# Altium PCB PCB.PcbDoc (part 2 of 2)
Units mil, origin at the board's own origin, x right, y up, seen from the top; angles counter-clockwise.
Board outline 3937.01 x 3937.01 mil, 4 copper layers (Top Layer, GND, POWER, Bottom Layer), stack 61.066 mil thick; 102 components, 56 nets, 281 pads, 1348 vias.
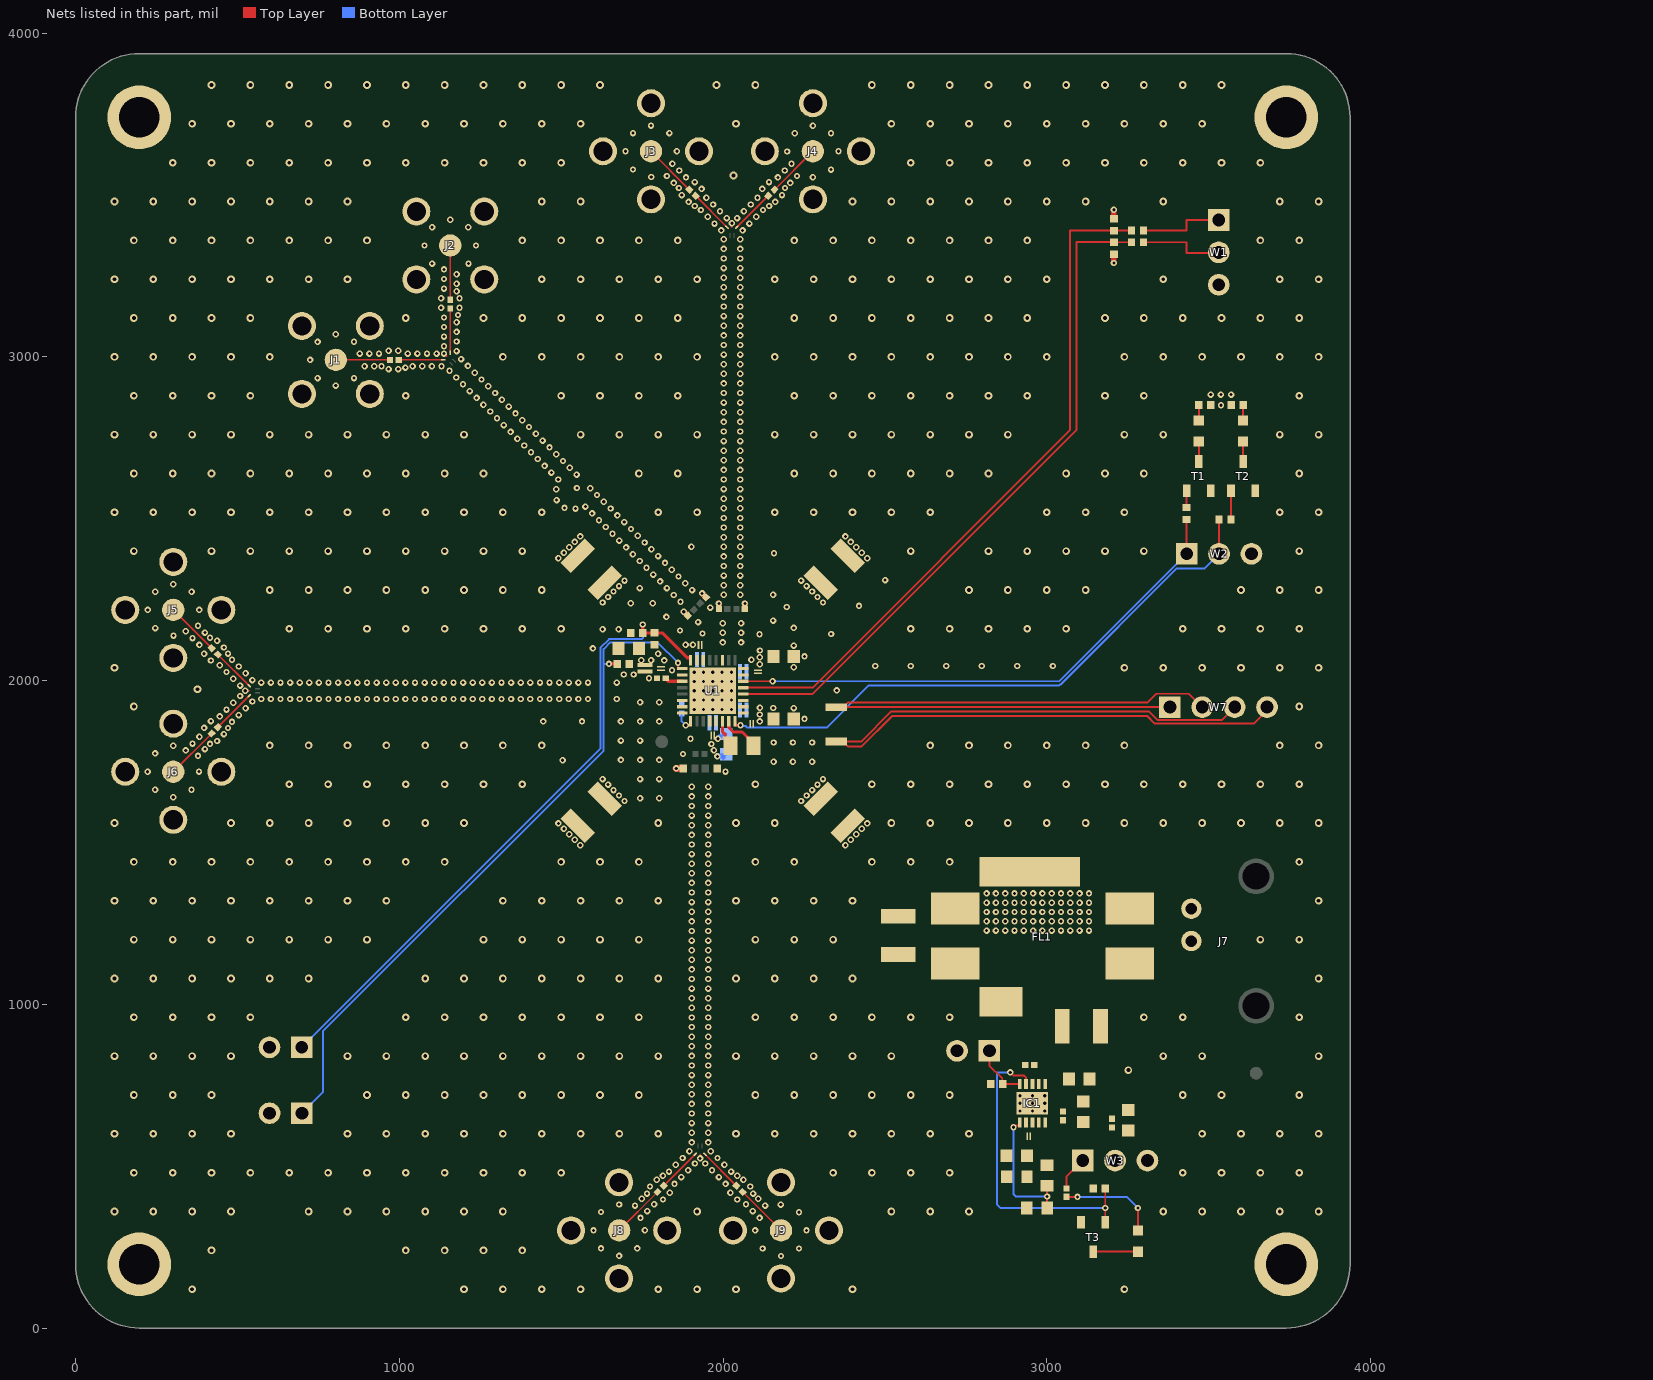
[diagram p4: the nets of this part, all layers, seen from the top]

## Via types
v1: diameter 19.68, hole 9.84, Top Layer to Bottom Layer, tented both sides, 742 vias
v2: diameter 23.62, hole 11.81, Top Layer to Bottom Layer, tented both sides, 597 vias
v3: diameter 19.68, hole 9.84, Top Layer to Bottom Layer, 9 vias

## Nets (pads, with @x,y where several pads share a name; then routed paths per layer and width w, separated by ;. In a path a pad name is that pad's centre, name@x,y a point inside that pad or via, vN(x,y) a via of type N, cw(c..) or ccw(c..) an arc to the next point about the centre after c; other vN are vias at no path point) (continued)
GND: C5.1 C6.1 C7.1 C8.1 C9.1 C10.1 C11.1 C12.1 C13.1 C14.1 C15.1 C19.1 C20.1 C21.1 C22.1 C23.1 C24.1 C25.1 C26.1 C27.1 C28.1 C29.1 C30.1 C31.1 C32.1 C33.1 C34.1 C35.1 C36.1 FL1.4 FL1.4_1 FL1.4_2 IC1.8 IC1.11 J1.2 J1.2_1 J1.2_2 J1.2_3 J2.2 J2.2_1 J2.2_2 J2.2_3 J3.2 J3.2_1 J3.2_2 J3.2_3 J4.2 J4.2_1 J4.2_2 J4.2_3 J5.2 J5.2_1 J5.2_2 J5.2_3 J6.2 J6.2_1 J6.2_2 J6.2_3 J8.2 J8.2_1 J8.2_2 J8.2_3 J9.2 J9.2_1 J9.2_2 J9.2_3 pad.Frame_Holes R6.1 R16.1 R17.1 R21.1 R22.1 R25.1 T1.2 T2.2 T3.2 U1.6 U1.7 U1.8 U1.13 U1.17 U1.19 U1.23 U1.27 U1.30 U1.33 W1.3 W2.3 W3.3 W4.2 W5.2 W6.2 | length 51.8
  Top Layer w5: v1@530.96,1968.5 536.09,1968.5 ; v1@1142.77,3005.49 1146.39,3001.87 ; v1@1929.13,530.96 1929.13,536.09 ; 2027.56,3400.92 v1@2027.56,3406.05
  Bottom Layer w6: C20.1@1991.46,1827.77 cw(c2010.37,1808.86) C20.1@2010.37,1835.6
  Bottom Layer w15: v1(1984.17,1820.49) C20.1@1991.46,1827.77
  other v1: 1679.13,222.85 2179.13,222.59 1622.94,246.13 1735.33,246.13 2122.39,245.58 2234.78,245.58 1599.95,301.77 1758.61,302.32 2099.11,301.77 2258.06,301.77 1745.18,340.33 2113.09,340.33 2234.78,357.97 1622.94,358.52 1766.17,361.33 2092.1,361.33 1728.19,378.31 2130.08,378.31 2178.58,381.25 1679.13,381.8 1787.16,382.32 2071.11,382.32 1814.52,396.94 2043.75,396.94 1749.18,399.3 2109.09,399.3 1765.27,415.39 2093,415.39 1835.51,417.93 2022.76,417.93 1774.3,437.16 2083.97,437.16 1850.13,445.29 2008.14,445.29 1795.29,458.15 2062.98,458.15 1871.12,466.28 1987.15,466.28 1814.22,470.71 2044.05,470.71 1833.14,483.26 2025.12,483.26 1892.11,487.27 1966.16,487.27 1854.13,504.26 2004.13,504.26 1913.1,508.26 1945.16,508.26 1929.13,524.18 1875.13,525.25 1983.14,525.25 1896.12,546.24 1962.15,546.24 1903.68,573.61 1954.58,573.61 1903.68,603.29 1954.58,603.29 1903.68,632.98 1954.58,632.98 1903.68,662.66 1954.58,662.66 1903.68,692.35 1954.58,692.35 1903.68,722.03 1954.58,722.03 1903.68,751.72 1954.58,751.72 1903.68,781.4 1954.58,781.4 1903.68,811.09 1954.58,811.09 1903.68,840.77 1954.58,840.77 1903.68,870.46 1954.58,870.46 1903.68,900.14 1954.58,900.14 1903.68,929.83 1954.58,929.83 1903.68,959.51 1954.58,959.51 1903.68,989.2 1954.58,989.2 1903.68,1018.88 1954.58,1018.88 1903.68,1048.57 1954.58,1048.57 1903.68,1078.25 1954.58,1078.25 1903.68,1107.94 1954.58,1107.94 1903.68,1137.62 1954.58,1137.62 1903.68,1167.31 1954.58,1167.31 1903.68,1196.99 1954.58,1196.99 1903.68,1226.68 1954.58,1226.68 2814.21,1227.86 2842.95,1227.86 2871.7,1227.86 2900.45,1227.86 2929.2,1227.86 2957.95,1227.86 2986.69,1227.86 3015.44,1227.86 3044.19,1227.86 3072.94,1227.86 3101.69,1227.86 3130.43,1227.86 1903.68,1256.36 1954.58,1256.36 2814.21,1256.6 2842.95,1256.6 2871.7,1256.6 2900.45,1256.6 2929.2,1256.6 2957.95,1256.6 2986.69,1256.6 3015.44,1256.6 3044.19,1256.6 3072.94,1256.6 3101.69,1256.6 3130.43,1256.6 2814.21,1285.35 2842.95,1285.35 2871.7,1285.35 2900.45,1285.35 2929.2,1285.35 2957.95,1285.35 2986.69,1285.35 3015.44,1285.35 3044.19,1285.35 3072.94,1285.35 3101.69,1285.35 3130.43,1285.35 1903.68,1286.05 1954.58,1286.05 2814.21,1314.1 2842.95,1314.1 2871.7,1314.1 2900.45,1314.1 2929.2,1314.1 2957.95,1314.1 2986.69,1314.1 3015.44,1314.1 3044.19,1314.1 3072.94,1314.1 3101.69,1314.1 3130.43,1314.1 1903.68,1315.73 1954.58,1315.73 2814.21,1342.85 2842.95,1342.85 2871.7,1342.85 2900.45,1342.85 2929.2,1342.85 2957.95,1342.85 2986.69,1342.85 3015.44,1342.85 3044.19,1342.85 3072.94,1342.85 3101.69,1342.85 3130.43,1342.85 1903.68,1345.42 1954.58,1345.42 1903.68,1375.1 1954.58,1375.1 1903.68,1404.79 1954.58,1404.79 1903.68,1434.47 1954.58,1434.47 1903.68,1464.16 1954.58,1464.16 1559.09,1491.48 2377.92,1491.48 1903.68,1493.84 1954.58,1493.84 1542.19,1508.38 2394.82,1508.38 1903.68,1523.53 1954.58,1523.53 1525.28,1525.28 2411.72,1525.28 1508.38,1542.19 2428.63,1542.19 1903.68,1553.21 1954.58,1553.21 1491.48,1559.09 2445.53,1559.09 1903.68,1582.9 1954.58,1582.9 1903.68,1612.58 1954.58,1612.58 1743.88,1636.47 1803.25,1636.47 301.77,1639.58 1903.68,1642.27 1954.58,1642.27 245.58,1662.86 357.97,1662.86 1903.68,1671.95 1954.58,1671.95 1743.88,1695.84 1803.25,1695.84 222.59,1718.5 381.25,1719.06 2007.84,1718.94 2156.43,1749.38 2215.8,1749.38 2275.17,1749.38 1504.51,1753.95 1684.51,1755.21 1743.88,1755.21 1803.25,1755.21 378.31,1767.56 1876.58,1773.39 245.58,1775.25 340.33,1784.55 399.3,1788.55 301.77,1798.53 415.39,1804.64 361.33,1805.54 2156.43,1808.75 2215.8,1808.75 2275.17,1808.75 437.16,1813.67 1684.51,1814.58 1743.88,1814.58 1899.61,1820.49 382.32,1826.53 458.15,1834.66 396.94,1853.89 470.71,1853.59 483.26,1872.51 1444.51,1873.95 1564.51,1873.95 1684.51,1873.95 1743.88,1873.95 1803.25,1873.95 417.93,1874.88 2251.85,1881.74 445.29,1889.5 504.26,1893.51 466.28,1910.49 1911.01,1911.01 1939.76,1911.01 1968.5,1911.01 1997.25,1911.01 2026,1911.01 525.25,1914.5 2218.42,1915.17 487.27,1931.48 1743.88,1933.32 1803.25,1933.32 546.24,1935.49 1911.01,1939.76 1939.76,1939.76 1968.5,1939.76 1997.25,1939.76 2026,1939.76 573.61,1943.05 603.29,1943.05 632.98,1943.05 662.66,1943.05 692.35,1943.05 722.03,1943.05 751.72,1943.05 781.4,1943.05 811.09,1943.05 840.77,1943.05 870.46,1943.05 900.14,1943.05 929.83,1943.05 959.51,1943.05 989.2,1943.05 1018.88,1943.05 1048.57,1943.05 1078.25,1943.05 1107.94,1943.05 1137.62,1943.05 1167.31,1943.05 1196.99,1943.05 1226.68,1943.05 1256.36,1943.05 1286.05,1943.05 1315.73,1943.05 1345.42,1943.05 1375.1,1943.05 1404.79,1943.05 1434.47,1943.05 1464.16,1943.05 1493.84,1943.05 1523.53,1943.05 1553.21,1943.05 1582.9,1943.05 1671.95,1943.05 508.26,1952.47 524.18,1968.5 1911.01,1968.5 1939.76,1968.5 1968.5,1968.5 1997.25,1968.5 2026,1968.5 2351.17,1969.93 508.26,1984.53 573.61,1993.95 603.29,1993.95 632.98,1993.95 662.66,1993.95 692.35,1993.95 722.03,1993.95 751.72,1993.95 781.4,1993.95 811.09,1993.95 840.77,1993.95 870.46,1993.95 900.14,1993.95 929.83,1993.95 959.51,1993.95 989.2,1993.95 1018.88,1993.95 1048.57,1993.95 1078.25,1993.95 1107.94,1993.95 1137.62,1993.95 1167.31,1993.95 1196.99,1993.95 1226.68,1993.95 1256.36,1993.95 1286.05,1993.95 1315.73,1993.95 1345.42,1993.95 1375.1,1993.95 1404.79,1993.95 1434.47,1993.95 1464.16,1993.95 1493.84,1993.95 1523.53,1993.95 1553.21,1993.95 1582.9,1993.95 1671.95,1993.95 1911.01,1997.25 1939.76,1997.25 1968.5,1997.25 1997.25,1997.25 2026,1997.25 546.24,2001.52 487.27,2005.53 1771.31,2007.16 1693.55,2018.84 1723.93,2018.84 525.25,2022.51 1911.01,2026 1939.76,2026 1968.5,2026 1997.25,2026 2026,2026 466.28,2026.52 2218.42,2041.39 504.26,2043.5 2470.11,2045 2579.87,2045 2689.64,2045 2799.4,2045 2909.16,2045 3018.92,2045 445.29,2047.51 417.93,2062.13 483.26,2064.49 2251.85,2074.82 396.94,2083.12 470.71,2083.42 1597.99,2099.58 458.15,2102.35 2218.42,2108.25 382.32,2110.48 1999.1,2118.14 2056.02,2118.14 437.16,2123.34 361.33,2131.47 415.39,2132.37 302.32,2139.03 2112.8,2143.5 2333.79,2144.14 1936.5,2145.7 399.3,2148.46 1999.1,2147.82 2056.02,2147.82 340.33,2152.46 1867.12,2154.97 1628.07,2158.93 1677.35,2158.93 246.13,2162.31 2218.42,2163.02 378.31,2169.45 1999.1,2177.51 2056.02,2177.51 1922.97,2180.89 2154.78,2185.48 1825.14,2196.95 222.85,2218.5 381.8,2218.5 1960.64,2225.43 2196.76,2227.47 2419.95,2230.89 1715.18,2238.93 1783.16,2238.93 1868.6,2243.67 1847.61,2264.66 2002.11,2265.05 2053.01,2265.05 2154.78,2265.05 246.13,2274.7 358.52,2274.7 1904.59,2279.66 1742.66,2285.65 1826.62,2285.65 2002.11,2294.74 2053.01,2294.74 301.77,2297.69 1883.6,2300.65 1805.63,2306.64 2500.8,2310.55 1862.61,2321.64 2002.11,2324.42 2053.01,2324.42 1784.64,2327.63 1841.62,2342.63 1763.65,2348.62 2002.11,2354.11 2053.01,2354.11 1820.63,2363.62 1742.66,2369.61 1491.48,2377.92 2445.53,2377.92 2002.11,2383.79 2053.01,2383.79 1799.64,2384.61 1721.67,2390.6 2157.35,2393.76 1508.38,2394.82 2428.63,2394.82 1778.65,2405.6 1525.28,2411.72 1700.68,2411.59 2411.72,2411.72 1902.42,2413.48 2002.11,2413.48 2053.01,2413.48 1757.66,2426.59 1542.19,2428.63 2394.82,2428.63 1679.69,2432.58 2002.11,2443.16 2053.01,2443.16 1559.09,2445.53 2377.92,2445.53 1736.67,2447.58 1658.7,2453.57 1715.68,2468.57 2002.11,2472.85 2053.01,2472.85 1637.71,2474.56 1694.69,2489.56 1616.72,2495.55 2002.11,2502.53 2053.01,2502.53 1673.7,2510.55 1595.73,2516.54 1544.25,2531.32 1652.71,2531.54 2002.11,2532.22 2053.01,2532.22 1510.33,2533.5 1574.74,2537.53 1631.72,2552.53 1486.07,2557.76 2002.11,2561.9 2053.01,2561.9 1610.73,2573.52 1484.56,2591.01 2002.11,2591.59 2053.01,2591.59 1548.69,2595.21 1589.74,2594.51 1490.77,2621.49 2002.11,2621.27 2053.01,2621.27 1547.76,2636.5 1469.78,2642.48 2002.11,2650.96 2053.01,2650.96 1526.77,2657.49 1448.79,2663.47 1505.78,2678.48 2002.11,2680.64 2053.01,2680.64 1427.8,2684.47 1484.78,2699.47 1406.81,2705.46 2002.11,2710.33 2053.01,2710.33 1463.79,2720.46 1385.82,2726.45 2002.11,2740.01 2053.01,2740.01 1442.8,2741.45 1364.83,2747.44 1421.81,2762.44 1343.84,2768.43 2002.11,2769.7 2053.01,2769.7 1400.82,2783.43 1322.85,2789.42 2002.11,2799.38 2053.01,2799.38 1379.83,2804.42 1301.86,2810.41 1358.84,2825.41 2002.11,2829.07 2053.01,2829.07 1280.87,2831.4 1337.85,2846.4 1259.88,2852.39 2002.11,2858.75 2053.01,2858.75 1316.86,2867.39 1238.89,2873.38 1295.87,2888.38 2002.11,2888.44 2053.01,2888.44 1217.9,2894.37 1274.88,2909.37 803.93,2911.3 1196.91,2915.36 2002.11,2918.12 2053.01,2918.12 1253.89,2930.36 747.73,2934.58 860.12,2934.58 1175.92,2936.35 2002.11,2947.81 2053.01,2947.81 1232.9,2951.35 1154.93,2957.34 966.95,2962.33 996.64,2962.33 1018.9,2966.84 892.74,2971.34 922.42,2971.34 945.17,2971.34 1041.17,2971.34 1070.85,2971.34 1100.54,2971.34 1130.22,2971.34 1211.91,2972.34 2002.11,2977.49 2053.01,2977.49 724.45,2990.78 1190.92,2993.33 2002.11,3007.18 2053.01,3007.18 877.9,3010.21 907.58,3010.21 937.27,3010.21 1026.32,3010.21 1056.01,3010.21 1085.69,3010.21 1115.38,3010.21 1137.97,3010.29 1176.91,3018.04 966.95,3019.22 996.64,3019.22 1138.05,3032.88 2002.11,3036.86 2053.01,3036.86 747.55,3046.38 860.12,3046.97 1176.91,3047.72 1138.05,3062.57 2002.11,3066.55 2053.01,3066.55 803.93,3070.25 1176.91,3077.41 1138.05,3092.25 2002.11,3096.23 2053.01,3096.23 1176.91,3107.09 1138.05,3121.94 2002.11,3125.92 2053.01,3125.92 1181.42,3129.36 1129.04,3151.62 1185.92,3151.62 2002.11,3155.6 2053.01,3155.6 1129.04,3181.31 1185.92,3181.31 2002.11,3185.29 2053.01,3185.29 1176.91,3203.09 1138.05,3210.99 2002.11,3214.97 2053.01,3214.97 1176.91,3225.83 1138.05,3240.68 2002.11,3244.66 2053.01,3244.66 1176.91,3255.52 1138.05,3270.36 2002.11,3274.34 2053.01,3274.34 1101.29,3288.13 1213.68,3288.13 2002.11,3304.03 2053.01,3304.03 2002.11,3333.71 2053.01,3333.71 1078.01,3344.33 1236.96,3344.33 2002.11,3363.4 2053.01,3363.4 1994.54,3390.77 2060.58,3390.77 1101.29,3400.53 1213.08,3400.71 1973.55,3411.76 2081.57,3411.76 2027.56,3412.83 1157.48,3423.8 2011.53,3428.75 2043.59,3428.75 1952.56,3432.75 2102.56,3432.75 1990.54,3449.74 2064.58,3449.74 1931.57,3453.74 2123.55,3453.74 1912.64,3466.3 2142.48,3466.3 1969.55,3470.73 2085.57,3470.73 1893.71,3478.86 2161.41,3478.86 1948.56,3491.72 2106.56,3491.72 1872.72,3499.85 2182.4,3499.85 1933.94,3519.08 2121.18,3519.08 1863.69,3521.62 2191.43,3521.62 1847.61,3537.7 2207.51,3537.7 1912.95,3540.07 2142.17,3540.07 1885.59,3554.69 2169.53,3554.69 2277.56,3555.21 1778.11,3555.76 1826.62,3558.7 2228.5,3558.7 1864.59,3575.68 2190.52,3575.68 2333.76,3578.49 1721.91,3579.04 1843.6,3596.67 2211.51,3596.67 1698.64,3635.24 1857.58,3635.24 2198.09,3634.68 2356.74,3635.24 1721.91,3691.43 1834.31,3691.43 2221.36,3690.88 2333.76,3690.88 1777.56,3714.42 2277.56,3714.16
  other v2: 360,120 1200,120 1320,120 1440,120 1560,120 1800,120 1920,120 2040,120 2400,120 3240,120 420,240 1020,240 1140,240 1260,240 1380,240 120,360 240,360 360,360 480,360 720,360 840,360 960,360 1080,360 1200,360 1320,360 1920,360 2520,360 2640,360 2760,360 3360,360 3480,360 3600,360 3720,360 3840,360 180,480 300,480 420,480 540,480 660,480 780,480 900,480 1020,480 1140,480 1260,480 1380,480 1500,480 2340,480 2460,480 2580,480 2700,480 3420,480 3540,480 3660,480 3780,480 120,600 240,600 360,600 480,600 840,600 960,600 1080,600 1200,600 1320,600 1440,600 1560,600 1680,600 1800,600 2040,600 2160,600 2280,600 2400,600 2520,600 2640,600 2760,600 3480,600 3600,600 3720,600 3840,600 180,720 300,720 420,720 900,720 1020,720 1140,720 1260,720 1380,720 1500,720 1620,720 1740,720 2100,720 2220,720 2340,720 2460,720 2580,720 2700,720 3420,720 3540,720 3780,720 3252.31,796.93 120,840 240,840 360,840 480,840 840,840 960,840 1080,840 1200,840 1320,840 1440,840 1560,840 1680,840 1800,840 2040,840 2160,840 2280,840 2400,840 2520,840 3360,840 3480,840 3840,840 180,960 300,960 420,960 540,960 1020,960 1140,960 1260,960 1380,960 1500,960 1620,960 1740,960 2100,960 2220,960 2340,960 2460,960 2580,960 2700,960 3300,960 3420,960 3780,960 120,1080 240,1080 360,1080 480,1080 600,1080 720,1080 1080,1080 1200,1080 1320,1080 1440,1080 1560,1080 1680,1080 1800,1080 2040,1080 2160,1080 2280,1080 2400,1080 3840,1080 180,1200 300,1200 420,1200 540,1200 660,1200 780,1200 900,1200 1260,1200 1380,1200 1500,1200 1620,1200 1740,1200 2100,1200 2220,1200 2340,1200 3660,1200 3780,1200 120,1320 240,1320 360,1320 480,1320 600,1320 720,1320 840,1320 960,1320 1320,1320 1440,1320 1560,1320 1680,1320 1800,1320 2040,1320 2160,1320 2280,1320 2400,1320 3840,1320 180,1440 300,1440 420,1440 540,1440 660,1440 780,1440 900,1440 1020,1440 1140,1440 1500,1440 1620,1440 1740,1440 2100,1440 2220,1440 2460,1440 2580,1440 2700,1440 3780,1440 120,1560 480,1560 600,1560 720,1560 840,1560 960,1560 1080,1560 1200,1560 1800,1560 2040,1560 2160,1560 2520,1560 2640,1560 2760,1560 2880,1560 3000,1560 3120,1560 3240,1560 3360,1560 3480,1560 3600,1560 3720,1560 3840,1560 660,1680 780,1680 900,1680 1020,1680 1140,1680 1260,1680 1380,1680 2100,1680 2460,1680 2580,1680 2700,1680 2820,1680 2940,1680 3060,1680 3180,1680 3300,1680 3420,1680 3540,1680 3660,1680 3780,1680 600,1800 720,1800 840,1800 960,1800 1080,1800 1200,1800 1320,1800 1440,1800 2640,1800 2760,1800 2880,1800 3000,1800 3120,1800 3240,1800 3720,1800 3840,1800 180,1920 3780,1920 376.42,1973.49 120,2040 3240,2040 3360,2040 3480,2040 3600,2040 3720,2040 3840,2040 660,2160 780,2160 900,2160 1020,2160 1140,2160 1260,2160 1380,2160 1500,2160 2580,2160 2700,2160 2820,2160 2940,2160 3060,2160 3420,2160 3540,2160 3660,2160 3780,2160 600,2280 720,2280 840,2280 960,2280 1080,2280 1200,2280 1320,2280 1440,2280 2760,2280 2880,2280 3000,2280 3120,2280 3600,2280 3720,2280 3840,2280 180,2400 420,2400 540,2400 660,2400 780,2400 900,2400 1020,2400 1140,2400 1260,2400 1380,2400 2580,2400 2820,2400 2940,2400 3060,2400 3180,2400 3300,2400 3780,2400 120,2520 240,2520 360,2520 480,2520 600,2520 720,2520 840,2520 960,2520 1080,2520 1200,2520 1320,2520 1440,2520 1800,2520 1920,2520 2160,2520 2280,2520 2400,2520 2520,2520 2640,2520 3000,2520 3120,2520 3240,2520 3720,2520 3840,2520 180,2640 300,2640 420,2640 540,2640 660,2640 780,2640 900,2640 1020,2640 1140,2640 1260,2640 1740,2640 1860,2640 2220,2640 2340,2640 2460,2640 2580,2640 2700,2640 2820,2640 3060,2640 3180,2640 3300,2640 3780,2640 120,2760 240,2760 360,2760 480,2760 600,2760 720,2760 840,2760 960,2760 1080,2760 1200,2760 1560,2760 1680,2760 1800,2760 1920,2760 2160,2760 2280,2760 2400,2760 2520,2760 2640,2760 2760,2760 2880,2760 3240,2760 3360,2760 3720,2760 3840,2760 180,2880 300,2880 420,2880 540,2880 1020,2880 1500,2880 1620,2880 1740,2880 1860,2880 2220,2880 2340,2880 2460,2880 2580,2880 2700,2880 2820,2880 2940,2880 3180,2880 3300,2880 3780,2880 120,3000 240,3000 360,3000 480,3000 600,3000 1320,3000 1440,3000 1560,3000 1680,3000 1800,3000 1920,3000 2160,3000 2280,3000 2400,3000 2520,3000 2640,3000 2760,3000 2880,3000 3000,3000 3240,3000 3360,3000 3480,3000 3600,3000 3720,3000 3840,3000 180,3120 300,3120 420,3120 540,3120 1020,3120 1260,3120 1380,3120 1500,3120 1620,3120 1740,3120 1860,3120 2220,3120 2340,3120 2460,3120 2580,3120 2700,3120 2820,3120 2940,3120 3180,3120 3300,3120 3420,3120 3540,3120 3660,3120 3780,3120 120,3240 240,3240 360,3240 480,3240 600,3240 720,3240 840,3240 1440,3240 1560,3240 1680,3240 1800,3240 1920,3240 2160,3240 2280,3240 2400,3240 2520,3240 2640,3240 2760,3240 2880,3240 3000,3240 3360,3240 3720,3240 3840,3240 180,3360 300,3360 420,3360 540,3360 660,3360 780,3360 900,3360 1380,3360 1500,3360 1620,3360 1740,3360 1860,3360 2220,3360 2340,3360 2460,3360 2580,3360 2700,3360 2820,3360 2940,3360 3660,3360 3780,3360 120,3480 240,3480 360,3480 480,3480 600,3480 720,3480 840,3480 1440,3480 1560,3480 2400,3480 2520,3480 2640,3480 2760,3480 2880,3480 3000,3480 3120,3480 3360,3480 3720,3480 3840,3480 2032.54,3560.59 300,3600 420,3600 540,3600 660,3600 780,3600 900,3600 1020,3600 1140,3600 1260,3600 1380,3600 1500,3600 2580,3600 2700,3600 2820,3600 2940,3600 3060,3600 3180,3600 3300,3600 3420,3600 3540,3600 3660,3600 360,3720 480,3720 600,3720 720,3720 840,3720 960,3720 1080,3720 1200,3720 1320,3720 1440,3720 1560,3720 2040,3720 2520,3720 2640,3720 2760,3720 2880,3720 3000,3720 3120,3720 3240,3720 3360,3720 3480,3720 420,3840 540,3840 660,3840 780,3840 900,3840 1020,3840 1140,3840 1260,3840 1380,3840 1500,3840 1620,3840 1980,3840 2100,3840 2460,3840 2580,3840 2700,3840 2820,3840 2940,3840 3060,3840 3180,3840 3300,3840 3420,3840 3540,3840
  other v3: 2917.42,670.89 2955.79,670.89 2994.16,670.89 2917.43,694.39 2955.8,694.39 2994.17,694.39 2917.42,717.89 2955.79,717.89 2994.16,717.89
LDO_out: C31.2 C32.2 IC1.9 IC1.10 R19.2 R20.2 R23.2 SW1.1 W3.1 | length 97
  Top Layer w6: 3060.75,441.33 3060.75,467.1 W3.1@3111.12,517.47
LOL: R15.1 U1.16 W2.2 | length 1837.2
  Top Layer w6: W2.2@3532.33,2391.73 R15.1@3532.33,2497.7
  Top Layer w7.77: U1.16@2037.4,1874 2037.4,1863.54 2038.52,1862.42 v1(2054.11,1862.42)
  Bottom Layer w6: v1(2054.11,1862.42) 2056.73,1859.8 2069.48,1859.8 2074.22,1855.06 2320.35,1855.06 2450.29,1985 3038.62,1985 3041.66,1988.03 3042.77,1988.03 3401.63,2346.89 3487.48,2346.89 W2.2@3532.33,2391.73
LOS: R14.1 U1.22 W2.1 | length 1638.4
  Top Layer w6: U1.22@2063,1998.03 v1(2153.15,1998.03) ; W2.1@3432.33,2391.73 R14.1@3432.33,2497.7
  Bottom Layer w6: v1(2153.15,1998.03) 3038.62,1998.03 W2.1@3432.33,2391.73
NetC1_1: C1.1 TA1.S | length 137
  Top Layer w5.18: C1.1@998.86,2990.78 TA1.S@1135.88,2990.78
NetC1_2: C1.2 J1.1 | length 167.4
  Top Layer w5.18: J1.1@803.93,2990.78 C1.2@971.3,2990.78
NetC2_1: C2.1 TA2.S | length 137
  Top Layer w5.18: TA2.S@1157.48,3012.37 C2.1@1157.48,3149.4
NetC2_2: C2.2 J2.1 | length 167.4
  Top Layer w5.18: C2.2@1157.48,3176.96 J2.1@1157.48,3344.33
NetC3_1: C3.1 TA3.S | length 137
  Top Layer w5.18: C3.1@1915.39,3497.4 TA3.S@2012.29,3400.51
NetC3_2: C3.2 J3.1 | length 167.4
  Top Layer w5.18: J3.1@1777.56,3635.24 C3.2@1895.91,3516.89
NetC4_1: C4.1 TA4.S | length 137
  Top Layer w5.18: TA4.S@2042.83,3400.51 C4.1@2139.72,3497.4
NetC4_2: C4.2 J4.1 | length 167.4
  Top Layer w5.18: C4.2@2159.21,3516.89 J4.1@2277.56,3635.24
NetC15_2: C15.2 U1.3 | length 57.3
  Top Layer w10: C15.2@1820.52,2007.16 1821.5,2007.16 1830.63,1998.03 U1.3@1874,1998.03
NetC16_1: C16.1 J5.1 | length 167.4
  Top Layer w5.18: J5.1@301.77,2218.5 C16.1@420.12,2100.16
NetC16_2: C16.2 TA5.S | length 137
  Top Layer w5.18: C16.2@439.61,2080.67 TA5.S@536.5,1983.78
NetC17_1: C17.1 J6.1 | length 167.4
  Top Layer w5.18: J6.1@301.77,1718.5 C17.1@420.12,1836.85
NetC17_2: C17.2 TA6.S | length 137
  Top Layer w5.18: C17.2@439.61,1856.34 TA6.S@536.5,1953.23
NetC18_1: C18.1 U1.14 | length 85
  Top Layer w10: U1.14@1998.03,1874 1998.03,1842.71 2006.52,1834.22 2006.52,1816.02 C18.1@2023.18,1799.37
NetC18_2: C18.2 U1.15 | length 122.1
  Top Layer w10: U1.15@2017.72,1874 2017.72,1855.52 2031.93,1841.31 2058.99,1841.31 2094.04,1806.26 C18.2@2094.04,1799.37
NetC35_2: C35.2 C36.2 IC1.7 R17.2
NetC37_1: C37.1 J8.1 | length 167.4
  Top Layer w5.18: J8.1@1679.13,301.77 C37.1@1797.48,420.12
NetC37_2: C37.2 TA7.S | length 137
  Top Layer w5.18: C37.2@1816.97,439.61 TA7.S@1913.86,536.5
NetC38_1: C38.1 J9.1 | length 167.4
  Top Layer w5.18: C38.1@2060.79,420.12 J9.1@2179.13,301.77
NetC38_2: C38.2 TA8.S | length 137
  Top Layer w5.18: TA8.S@1944.41,536.5 C38.2@2041.3,439.61
NetFL1_1: FL1.1 J7.1
NetFL1_3: FL1.3 J7.2
NetIC1_5: IC1.5 R16.2 W4.1 | length 176.7
  Top Layer w6: W4.1@2822.9,856.5 2822.9,810.9 2862.66,771.13 2862.66,755.41 R16.2@2864.63,753.44 IC1.5@2916.43,753.44 2916.43,757.32 IC1.5@2915.98,757.77
NetIC2_1: IC2.1 W7.1 W7.2 | length 2173.6
  Top Layer w6: IC2.1@2350,1918.15 IC2.1@2371.65,1918.15 ; W7.1@3380.51,1918.15 IC2.1@2371.65,1918.15 ; W7.2@3480.51,1918.15 3439.19,1959.47 3338.36,1959.47 3311.68,1932.79 2386.29,1932.79 IC2.1@2371.65,1918.15
NetIC2_2: IC2.2 W7.3 W7.4 | length 2687.9
  Top Layer w6: IC2.2@2350,1811.85 IC2.2@2371.65,1811.85 ; W7.3@3580.51,1918.15 3540.04,1877.68 3342.32,1877.68 3315,1905 2519.87,1905 2426.72,1811.85 IC2.2@2371.65,1811.85 ; W7.4@3680.51,1918.15 3680.51,1907.79 3640.87,1868.15 3332.68,1868.15 3310.11,1890.71 2522.18,1890.71 2427.46,1796 2387.5,1796 IC2.2@2371.65,1811.85
NetLD1_1: LD1.1 T1.3 | length 61.6
  Top Layer w6: T1.3@3469.73,2677.25 LD1.1@3469.73,2738.81
NetLD1_2: LD1.2 R12.1 | length 47.2
  Top Layer w6: LD1.2@3469.73,2803.77 R12.1@3469.73,2850.94
NetLD2_1: LD2.1 T2.3 | length 61.6
  Top Layer w6: T2.3@3606.74,2677.25 LD2.1@3606.74,2738.81
NetLD2_2: LD2.2 R13.1 | length 47.2
  Top Layer w6: LD2.2@3606.74,2803.77 R13.1@3606.74,2850.94
NetLD3_1: LD3.1 T3.3 | length 138.2
  Top Layer w6: T3.3@3143.31,235.93 LD3.1@3281.53,235.93
NetLD3_2: LD3.2 R23.1 | length 305
  Top Layer w6: R23.1@3060.75,405.11 v1(3095.04,405.11) ; LD3.2@3281.53,300.89 v1(3281.53,370.99)
  Bottom Layer w6: v1(3095.04,405.11) 3247.41,405.11 v1(3281.53,370.99)
NetR5_1: R5.1 R6.2 U1.32 W5.1 | length 2012.8
  Top Layer w10: R6.2@1752.19,2146.93 v1(1752.19,2173.41) ; R6.2@1752.78,2147.52 R5.1@1787.86,2147.52 1812.12,2147.52 1889.12,2070.52 1897.61,2070.52 1899.61,2068.52 U1.32@1899.61,2063
  Bottom Layer w6: W5.1@699,867.24 1621.35,1789.58 1621.35,2101.68 1648.21,2128.54 1748.67,2128.54 1752.19,2132.06 v1(1752.19,2173.41)
NetR7_1: R7.1 R9.1 U1.21 | length 2144.7
  Top Layer w6: U1.21@2063,1978.35 2276.67,1978.35 3071.76,2773.44 3071.76,3389.9 R7.1@3207.56,3389.9 R9.1@3261.82,3389.94
NetR8_1: R8.1 R10.1 U1.20 | length 2116.2
  Top Layer w6: U1.20@2063,1958.66 2276.67,1958.66 ; 2276.93,1959.1 3091.45,2773.62 3091.45,3353.55 ; 3091.45,3354.62 R8.1@3207.56,3354.62 3207.56,3354.26 R10.1@3261.82,3354.26
NetR11_1: R11.1 U1.1 W6.1 | length 2155.1
  Top Layer w6: v1(1861,2054.86) 1861,2039.4 U1.1@1874,2037.4
  Top Layer w10: v1(1647.82,2051.83) R11.1@1673.3,2051.83
  Bottom Layer w6: W6.1@699.09,663.62 763.87,728.41 763.87,916.17 1631.35,1783.64 1631.35,2051.83 ; v1(1647.82,2051.83) 1631.35,2051.83 ; v1(1861,2054.86) 1797.58,2118.28 1652.09,2118.28 1631.35,2097.54 1631.35,2051.83
NetR14_2: R14.2 T1.1 | length 52
  Top Layer w6: R14.2@3432.33,2534.71 T1.1@3432.33,2586.7
NetR15_2: R15.2 T2.1 | length 89
  Top Layer w6: R15.2@3569.33,2497.7 T2.1@3569.34,2586.7
NetR22_2: R22.2 U1.9 | length 62.2
  Top Layer w6: U1.9@1897.78,1861.9 1899.61,1863.72 U1.9@1899.61,1874
  Top Layer w7.77: v1(1884.74,1861.9) U1.9@1897.78,1861.9
  Bottom Layer w6: R22.2@1872.33,1893.07 1872.33,1874.31 v1(1884.74,1861.9)
pg: IC1.4 R20.1 T3.1 | length 968.1
  Top Layer w6: v1(2887.34,789.64) 2888.12,789.64 2898.11,779.65 2929.79,779.65 2936.12,773.32 IC1.4@2936.12,753.44 ; T3.1@3180.71,326.48 R20.1@3180.71,431.09
  Bottom Layer w6: v1(2887.34,789.64) 2846.15,789.64 2846.15,381.84 2857,370.99 v1(3180.71,370.99)
pgfb: IC1.6 R19.1 R21.2 | length 413.6
  Top Layer w6: v1(2897.52,620.37) 2899.9,620.37 2904.57,625.04 2915.98,625.04 2916.43,625.49 IC1.6@2916.43,635.33 ; R21.2@3001.19,370.99 v1(3001.19,406.55) R19.1@3001.19,440.03
  Bottom Layer w6: v1(2897.52,620.37) 2897.52,412.94 2903.92,406.55 v1(3001.19,406.55)
Pmain: C27.2 C28.2 C29.2 C30.2 FL1.2 IC1.1 IC1.2 IC1.3
SCK: R10.2 W1.2 | length 265.5
  Top Layer w6: R10.2@3298.83,3354.26 3431.3,3354.26 3431.3,3321.33 W1.2@3531.36,3321.33
SDA: R9.2 W1.1 | length 265.5
  Top Layer w6: R9.2@3298.83,3389.94 3431.3,3389.94 3431.3,3422.87 W1.1@3531.36,3422.87
Vcc: C5.2 C6.2 C7.2 C8.2 C9.2 C10.2 C11.2 C12.2 C13.2 C14.2 C19.2 C20.2 C21.2 C22.2 C23.2 C24.2 C25.2 C26.2 C33.2 C34.2 R1.2 R2.2 R3.2 R4.2 R5.2 R7.2 R8.2 R11.2 R12.2 R13.2 R24.2 U1.2 U1.12 U1.18 U1.24 U1.31 W3.2 | length 177.4
  Top Layer w17: v1(1878.91,2212.84) R1.2@1891.36,2200.4 ; v1(1935.47,2269.4) 1935.47,2269.34 1947.86,2256.95 R2.2@1947.91,2256.95 ; R3.2@1987.36,2221.39 1987.48,2221.5 1987.48,2238.26 v1(1987.34,2238.4) ; R4.2@2067.5,2221.28 v1(2067.5,2238.4) ; v1(3207.56,3290.24) R8.2@3207.56,3317.62 ; R7.2@3207.56,3426.91 v1(3207.56,3454.37)
  Top Layer w22: v1(1855.43,1728.94) R24.2@1873.89,1728.94
  Bottom Layer w6: C20.2@2000.63,1762.88 C20.2@2010.37,1772.61
  Bottom Layer w15: v1(1982.55,1765.89) 1983.45,1766.78 1998.18,1766.78 2000.63,1764.33 C20.2@2000.63,1762.88
  other v1: 1695.68,1628.07 2241.33,1628.07 1678.78,1644.97 2258.23,1644.97 1661.87,1661.87 2275.13,1661.87 1644.97,1678.78 2292.04,1678.78 1628.07,1695.68 2308.94,1695.68 1971.89,1784.66 1964.08,1804.02 2113.53,1873.94 2113.53,1895.34 2155.43,1915.5 2113.91,1916.48 1842.41,2032.09 2113.4,2050.68 1747.38,2062.77 1777.75,2062.94 1818.37,2062.57 2087.52,2064.31 2113.4,2072.08 1799.57,2083.23 2113.78,2093.23 1884.45,2110.79 1906.81,2110.79 1628.07,2241.33 2308.94,2241.33 1644.97,2258.23 2292.04,2258.23 1661.87,2275.13 2275.13,2275.13 1678.78,2292.04 2258.23,2292.04 1695.68,2308.94 2241.33,2308.94 3538.39,2850.94 3506.41,2883.59 3538.07,2883.59 3569.72,2883.59
pads on no net: FTG1.FTG2 FTG2.FTG2 FTG3.FTG2 FTG4.FTG2 J7.MECH J7.MECH_1

## Polygon pours and split planes (outlines as drawn)
LDO_out on Top Layer "VDDIO_LDO_OUT" (solid, remove dead copper, pour order 5): 3158.58,440.94 3051.82,440.94 3051.82,471.18 2969.58,471.17 2969.58,651.08 3158.59,651.08
GND on Top Layer "GND_L01_P074" (solid, remove dead copper, pour order 74): 0,3933.5 3.51,3937.01 3937.01,3937.01 3937.01,0 0,0
Vcc on Top Layer "VCC_L01_P032" (solid, remove dead copper, pour order 32): 3495.2,2838.74 3581.15,2838.74 3581.15,2897.64 3495.42,2897.64
Vcc on Top Layer "VCC_L01_P073" (solid, remove dead copper, pour order 73): 1655.36,1549.29 1728.17,1622.1 1622.1,1728.17 1549.03,1655.1
Vcc on Top Layer "VCC_L01_P071" (solid, remove dead copper, pour order 71): 2387.72,1655.36 2314.91,1728.17 2208.84,1622.1 2281.91,1549.03
Vcc on Top Layer "VCC_L01_P069" (solid, remove dead copper, pour order 69): 2281.65,2387.72 2208.84,2314.91 2314.91,2208.84 2387.98,2281.91
Vcc on Top Layer "VCC_L01_P062" (solid, remove dead copper, pour order 62): 1549.29,2281.65 1622.1,2208.84 1728.17,2314.91 1655.1,2387.98
Vcc on Top Layer "Top Layer-Vcc 2" (solid, remove dead copper, pour order 49): 1926.65,2127.26 1872.63,2127.26 1872.63,2102.86 1911.89,2083.33 1911.89,2047 1926.65,2047.04
Vcc on Top Layer "Top Layer-Vcc 5" (solid, remove dead copper, pour order 30): 2047,1926.65 2047,1914.29 2079.37,1914.29 2084.22,1910.17 2091.43,1890.05 2091.43,1851.9 2193.04,1851.9 2193.04,1926.61
Vcc on Top Layer "Top Layer-Vcc" (solid, remove dead copper, pour order 26): 3167.7,629.23 3281.44,629.23 3281.44,578.31 3261.15,578.31 3261.15,471.18 3168.04,471.18
Pmain on Top Layer "Top Layer-Pmain" (solid, remove dead copper, pour order 19): 2466.75,1058 2929.39,1058 2929.39,903.36 2949.9,880.26 2949.9,737.69 3108.08,737.69 3108.08,857.93 3108.09,1212.93 2466.75,1212.93
NetFL1_3 on Top Layer "INPUT_POWER_N" (solid, remove dead copper, pour order 1): 3367.56,1245.49 3331.18,1209.11 3158.48,1209.11 3158.48,1377.93 3493.09,1377.93 3493.09,1245.49
NetFL1_1 on Top Layer "INPUT_POWER_P" (solid, remove dead copper, pour order 0): 3158.48,1209.11 3158.48,1037.93 3426.85,1037.93 3493.09,1104.17 3493.09,1245.49 3367.56,1245.49 3331.18,1209.11
NetC35_2 on Top Layer "Top Layer-NetC35_2" (solid, remove dead copper, pour order 18): 2843.23,562.53 2843.23,431.91 2905.01,431.91 2905.01,566.68 2942.02,575.06 2942.02,651.08 2930.21,651.08 2930.21,612.76
Vcc on Top Layer "Top Layer-Vcc 1" (solid, remove dead copper, pour order 58): 1825.49,2039.69 1846.62,2007.16 1889.9,2007.16 1890.04,2027.73 1855.12,2027.73 1809.13,2130.4 1704.51,2130.47 1704.62,2039.73
Vcc on Top Layer "Top Layer-Vcc 4" (solid, remove dead copper, pour order 39): 2130.25,2030.06 2194.09,2046.14 2194.09,2104.91 2094.09,2104.91 2063,2042.4 2047,2042.4 2047,2030.06
GND on Bottom Layer "GND_L04_P065" (solid, remove dead copper, pour order 65): 3937.01,3937.01 3937.01,0 0,0 0,3937.01
Vcc on Bottom Layer "Top Layer-Vcc 2" (solid, remove dead copper, pour order 57): 1926.68,2127.24 1872.65,2127.24 1872.65,2102.84 1911.91,2083.32 1911.91,2041.9 1926.68,2041.98
Vcc on Bottom Layer "VCC_L04_P038" (solid, remove dead copper, pour order 38): 2066.68,1933.11 2170.69,1933.11 2170.69,1862.12 2066.68,1862.12
Vcc on Bottom Layer "Bottom Layer-Vcc 1" (solid, remove dead copper, pour order 37): 2066.68,2004.32 2129.48,2004.32 2129.48,2105.16 2107.99,2105.16 2107.99,2104.96 2094.72,2104.96 2066.68,2051.39
Vcc on Bottom Layer "Bottom Layer-Vcc" (solid, remove dead copper, pour order 40): 1952.76,1794.37 1981.58,1738.4 2046.34,1738.4 2046.34,1806.08 1977.56,1806.08 1973.96,1806.08 1964.57,1832.99 1964.57,1893.63 1952.76,1893.63
Vcc on POWER (split plane): 197,3916.91 3740.01,3916.91 3740.71,3916.98 3751.58,3916.62 3763.11,3915.49 3774.54,3913.6 3785.82,3910.97 3796.9,3907.61 3807.74,3903.53 3818.29,3898.75 3828.51,3893.29 3838.34,3887.17 3847.76,3880.43 3856.71,3873.08 3865.16,3865.16 3873.08,3856.71 3880.43,3847.76 3887.17,3838.34 3893.29,3828.51 3898.75,3818.29 3903.53,3807.74 3907.61,3796.9 3910.97,3785.82 3913.6,3774.54 3915.49,3763.11 3916.62,3751.58 3916.98,3740.71 3916.91,3740.01 3916.91,787.4 3916.91,197 3916.98,196.3 3916.62,185.42 3915.49,173.9 3913.6,162.47 3910.97,151.19 3907.61,140.11 3903.53,129.27 3898.75,118.72 3893.29,108.5 3887.17,98.67 3880.43,89.25 3873.08,80.3 3865.16,71.85 3856.71,63.93 3847.76,56.58 3838.34,49.83 3828.51,43.72 3818.29,38.26 3807.74,33.48 3796.9,29.4 3785.82,26.04 3774.54,23.41 3763.11,21.52 3751.58,20.38 3740.71,20.03 3740.01,20.1 197,20.1 196.3,20.03 185.42,20.38 173.9,21.52 162.47,23.41 151.19,26.04 140.11,29.4 129.27,33.48 118.72,38.26 108.5,43.72 98.67,49.83 89.25,56.58 80.3,63.93 71.85,71.85 63.93,80.3 56.58,89.25 49.83,98.67 43.72,108.5 38.26,118.72 33.48,129.27 29.4,140.11 26.04,151.19 23.41,162.47 21.52,173.9 20.38,185.42 20.03,196.3 20.1,197 20.1,3740.01 20.03,3740.71 20.38,3751.58 21.52,3763.11 23.41,3774.54 26.04,3785.82 29.4,3796.9 33.48,3807.74 38.26,3818.29 43.72,3828.51 49.83,3838.34 56.58,3847.76 63.93,3856.71 71.85,3865.16 80.3,3873.08 89.25,3880.43 98.67,3887.17 108.5,3893.29 118.72,3898.75 129.27,3903.53 140.11,3907.61 151.19,3910.97 162.47,3913.6 173.9,3915.49 185.42,3916.62 196.3,3916.98
GND on GND (split plane): 197,3916.91 3740.01,3916.91 3740.71,3916.98 3751.58,3916.62 3763.11,3915.49 3774.54,3913.6 3785.82,3910.97 3796.9,3907.61 3807.74,3903.53 3818.29,3898.75 3828.51,3893.29 3838.34,3887.17 3847.76,3880.43 3856.71,3873.08 3865.16,3865.16 3873.08,3856.71 3880.43,3847.76 3887.17,3838.34 3893.29,3828.51 3898.75,3818.29 3903.53,3807.74 3907.61,3796.9 3910.97,3785.82 3913.6,3774.54 3915.49,3763.11 3916.62,3751.58 3916.98,3740.71 3916.91,3740.01 3916.91,787.4 3916.91,197 3916.98,196.3 3916.62,185.42 3915.49,173.9 3913.6,162.47 3910.97,151.19 3907.61,140.11 3903.53,129.27 3898.75,118.72 3893.29,108.5 3887.17,98.67 3880.43,89.25 3873.08,80.3 3865.16,71.85 3856.71,63.93 3847.76,56.58 3838.34,49.83 3828.51,43.72 3818.29,38.26 3807.74,33.48 3796.9,29.4 3785.82,26.04 3774.54,23.41 3763.11,21.52 3751.58,20.38 3740.71,20.03 3740.01,20.1 197,20.1 196.3,20.03 185.42,20.38 173.9,21.52 162.47,23.41 151.19,26.04 140.11,29.4 129.27,33.48 118.72,38.26 108.5,43.72 98.67,49.83 89.25,56.58 80.3,63.93 71.85,71.85 63.93,80.3 56.58,89.25 49.83,98.67 43.72,108.5 38.26,118.72 33.48,129.27 29.4,140.11 26.04,151.19 23.41,162.47 21.52,173.9 20.38,185.42 20.03,196.3 20.1,197 20.1,3740.01 20.03,3740.71 20.38,3751.58 21.52,3763.11 23.41,3774.54 26.04,3785.82 29.4,3796.9 33.48,3807.74 38.26,3818.29 43.72,3828.51 49.83,3838.34 56.58,3847.76 63.93,3856.71 71.85,3865.16 80.3,3873.08 89.25,3880.43 98.67,3887.17 108.5,3893.29 118.72,3898.75 129.27,3903.53 140.11,3907.61 151.19,3910.97 162.47,3913.6 173.9,3915.49 185.42,3916.62 196.3,3916.98

## Keep-outs
Keep-Out Layer:
  the board outline again, w3.94

## Other copper
Top Layer:
  region net Vcc: 1926.65,2047 1926.65,2079.01 1911.89,2079.01 1911.89,2047
  region net Vcc: 1890,2007.16 1890,2027.73 1877.65,2027.73 1877.65,2007.16
  rectangle net Vcc: 2047,1914.29 2079,1926.65
  pour cut-out: 1160.17,2968.12 1162.99,2970.95 1152.67,2981.28 1149.84,2978.45
  pour cut-out: 1180.14,2988.09 1177.31,2985.27 1166.98,2995.59 1169.81,2998.42
  pour cut-out: 1166.07,3007.44 1162.07,3007.44 1162.07,3026.68 1166.07,3026.68
  pour cut-out: 1130.95,2999.37 1130.95,2995.37 1150.19,2995.37 1150.19,2999.37
  pour cut-out: 1148.89,3017.31 1152.89,3017.31 1152.89,2998.07 1148.89,2998.07
  pour cut-out: 1140.82,2982.19 1140.82,2986.19 1121.58,2986.19 1121.58,2982.19
  region net GND: 1148.89,3004.36 1143.9,2999.37 1146.32,2999.37 1148.89,3001.94
  pour cut-out: 1915.01,569.69 1919.01,569.69 1919.01,555.08 1915.01,555.08
  pour cut-out: 1943.26,569.69 1939.26,569.69 1939.26,555.08 1943.26,555.08
  pour cut-out: 1946.99,546.07 1944.16,543.24 1957.77,529.63 1960.59,532.46
  pour cut-out: 1911.28,546.07 1914.11,543.24 1900.5,529.63 1897.67,532.46
  pour cut-out: 1916.45,526.93 1913.62,529.76 1927.22,543.37 1930.05,540.54
  pour cut-out: 1941.82,526.93 1944.65,529.76 1931.04,543.37 1928.22,540.54
  region net GND: 1932.66,536.09 1925.6,536.09 1927.32,537.81 1930.95,537.81
  pour cut-out: 569.69,1982.63 569.69,1978.63 555.08,1978.63 555.08,1982.63
  pour cut-out: 569.69,1954.38 569.69,1958.38 555.08,1958.38 555.08,1954.38
  pour cut-out: 546.07,1950.65 543.24,1953.48 529.63,1939.87 532.46,1937.04
  pour cut-out: 546.07,1986.36 543.24,1983.53 529.63,1997.14 532.46,1999.96
  pour cut-out: 526.93,1981.19 529.76,1984.02 543.37,1970.41 540.54,1967.59
  pour cut-out: 526.93,1955.82 529.76,1952.99 543.37,1966.59 540.54,1969.42
  region net GND: 536.09,1964.97 536.09,1972.03 537.81,1970.32 537.81,1966.69
  region net GND: 2024.03,3400.91 2031.09,3400.91 2029.37,3399.2 2025.74,3399.2
  pour cut-out: 2014.87,3410.07 2012.04,3407.24 2025.65,3393.64 2028.48,3396.47
  pour cut-out: 2040.25,3410.07 2043.08,3407.24 2029.47,3393.64 2026.64,3396.47
  pour cut-out: 2045.41,3390.94 2042.59,3393.77 2056.19,3407.38 2059.02,3404.55
  pour cut-out: 2009.7,3390.94 2012.53,3393.77 1998.93,3407.38 1996.1,3404.55
  pour cut-out: 2013.44,3367.32 2017.44,3367.32 2017.44,3381.92 2013.44,3381.92
  pour cut-out: 2041.68,3367.32 2037.68,3367.32 2037.68,3381.92 2041.68,3381.92
  pour cut-out: 1807.64,1983.02 1803.64,1983.02 1803.64,1997.63 1807.64,1997.63
  region net Vcc: 1953.66,1890 1963.66,1890 1966,1840.17 1966,1816.8 1979.76,1801.4 1996.25,1801.4 1996.25,1755.87 1973.85,1755.87 1953.55,1794.1
  pour cut-out: 2036.37,1766.83 2036.37,1770.83 2072.39,1770.83 2072.39,1766.83
Bottom Layer:
  rectangle net GND: 1976.86,1810.15 2042.02,1817.89
GND (plane layer: these items are gaps in the copper):
  region: 2321.43,3591.36 cw(c2277.56,3635.24) 2233.69,3591.36 cw(c2277.56,3635.24) 2233.69,3679.11 cw(c2277.56,3635.24) 2321.43,3679.11 cw(c2277.56,3635.24)
  region: 1821.43,3591.36 cw(c1777.56,3635.24) 1733.69,3591.36 cw(c1777.56,3635.24) 1733.69,3679.11 cw(c1777.56,3635.24) 1821.43,3679.11 cw(c1777.56,3635.24)
  region: 2223.01,257.9 cw(c2179.13,301.77) 2135.26,257.9 cw(c2179.13,301.77) 2135.26,345.65 cw(c2179.13,301.77) 2223.01,345.65 cw(c2179.13,301.77)
  region: 1723.01,257.9 cw(c1679.13,301.77) 1635.26,257.9 cw(c1679.13,301.77) 1635.26,345.65 cw(c1679.13,301.77) 1723.01,345.65 cw(c1679.13,301.77)
  region: 345.64,1674.63 cw(c301.77,1718.5) 257.9,1674.63 cw(c301.77,1718.5) 257.9,1762.38 cw(c301.77,1718.5) 345.64,1762.38 cw(c301.77,1718.5)
  region: 345.64,2174.63 cw(c301.77,2218.5) 257.9,2174.63 cw(c301.77,2218.5) 257.9,2262.38 cw(c301.77,2218.5) 345.64,2262.38 cw(c301.77,2218.5)
  region: 803.93,2928.73 cw(c803.93,2990.78) 741.88,2990.78 cw(c803.93,2990.78) 803.93,3052.82 cw(c803.93,2990.78) 865.97,2990.78 cw(c803.93,2990.78)
  region: 1157.48,3282.29 cw(c1157.48,3344.33) 1095.44,3344.33 cw(c1157.48,3344.33) 1157.48,3406.38 cw(c1157.48,3344.33) 1219.53,3344.33 cw(c1157.48,3344.33)

## Silkscreen, mask and mechanical layers (free items; w line width, h text height)
Top Overlay:
  lines w10: 3300,700 3290,710 ; 3380,710 3290,710 ; 3415,545 3405,555 ; 3870,555 3405,555 ; 3290,710 3300,720 3290,710 ; 3405,555 3415,565 3405,555
  text "REC CLK" at 1886.99,3837.5 h40 r359.89
  text "P" at 1532.95,3695.42 h40
  text "N" at 2481.97,3695.42 h40
  text "I2C" at 3488.81,3559.45 h40 r359.89
  text "SDA" at 3650,3403.7 h40
  text "SCK" at 3650,3303.7 h40
  text "DATA OUT" at 589.14,3299.37 h40 r359.89
  text "N" at 1382.9,3255.79 h40
  text "GND" at 3650,3213.7 h40
  text "P" at 540.49,2904.35 h40
  text "LOL" at 3669.09,2830.74 h40
  text "LOS" at 3302.93,2829.98 h40
  text "N" at 127.05,2352.29 h40
  text "LOS LOL GND" at 3320.37,2253.07 h40
  text "temp sense" at 3345,2033.33 h40
  text "DATA IN" at 683.89,2019.75 h40 r359.89
  text "+" at 3365,1803.34 h40
  text "+" at 3465,1803.34 h40
  text "-" at 3565,1800.01 h40
  text "-" at 3665,1800.01 h40
  text "Power IN" at 3451.02,1590.98 h50 r359.89
  text "P" at 125.82,1547.46 h40
  text "(3.6 to 6 V)" at 3420.02,1519.98 h40 r359.89
  text "VBER output pin" at 813.23,854.68 h40
  text "I probe" at 2387.3,807.39 h40
  text "GND ILIM" at 2372.18,733.58 h40
  text "BER Voltage En" at 814.48,648.93 h40
  text "LDO Vcc GND" at 3444.17,494.25 h40
  text "(3.3 V)" at 3540.02,429.98 h40 r359.89
  text "Power Good" at 3132.5,136.2 h40
  text "REF CLK" at 1797.22,60.95 h40
  text "P" at 1435.31,58.98 h40
  text "N" at 2386.03,58.98 h40
Bottom Overlay:
  text "Rev .Board_Revision" at 560,50 h40
  text "June 2024" at 990,50 h40
Top Solder:
  drawing of 16 lines, arcs and shapes, not listed
Bottom Solder:
  drawing of 14 lines, arcs and shapes, not listed
  text "CERN" at 2646.6,235.94 h54.42
  text "EP-ESE" at 3574.71,110.92 h400

## Text inside footprints (layer, text, board x,y; h text height)
U1: Mechanical 13 "*" at 1877.5,2022.24 h50